# Altium PCB DSP大板子.PcbDoc (part 7 of 9)
Units mil, origin at the board's own origin, x right, y up, seen from the top; angles counter-clockwise.
Board outline 7874.02 x 9055.12 mil, 4 copper layers (Top Layer, GND02, PWR03, Bottom Layer), stack 23.756 mil thick; 656 components, 360 nets, 1967 pads, 2623 vias.
Unrouted connection lines stored in the file: 70.
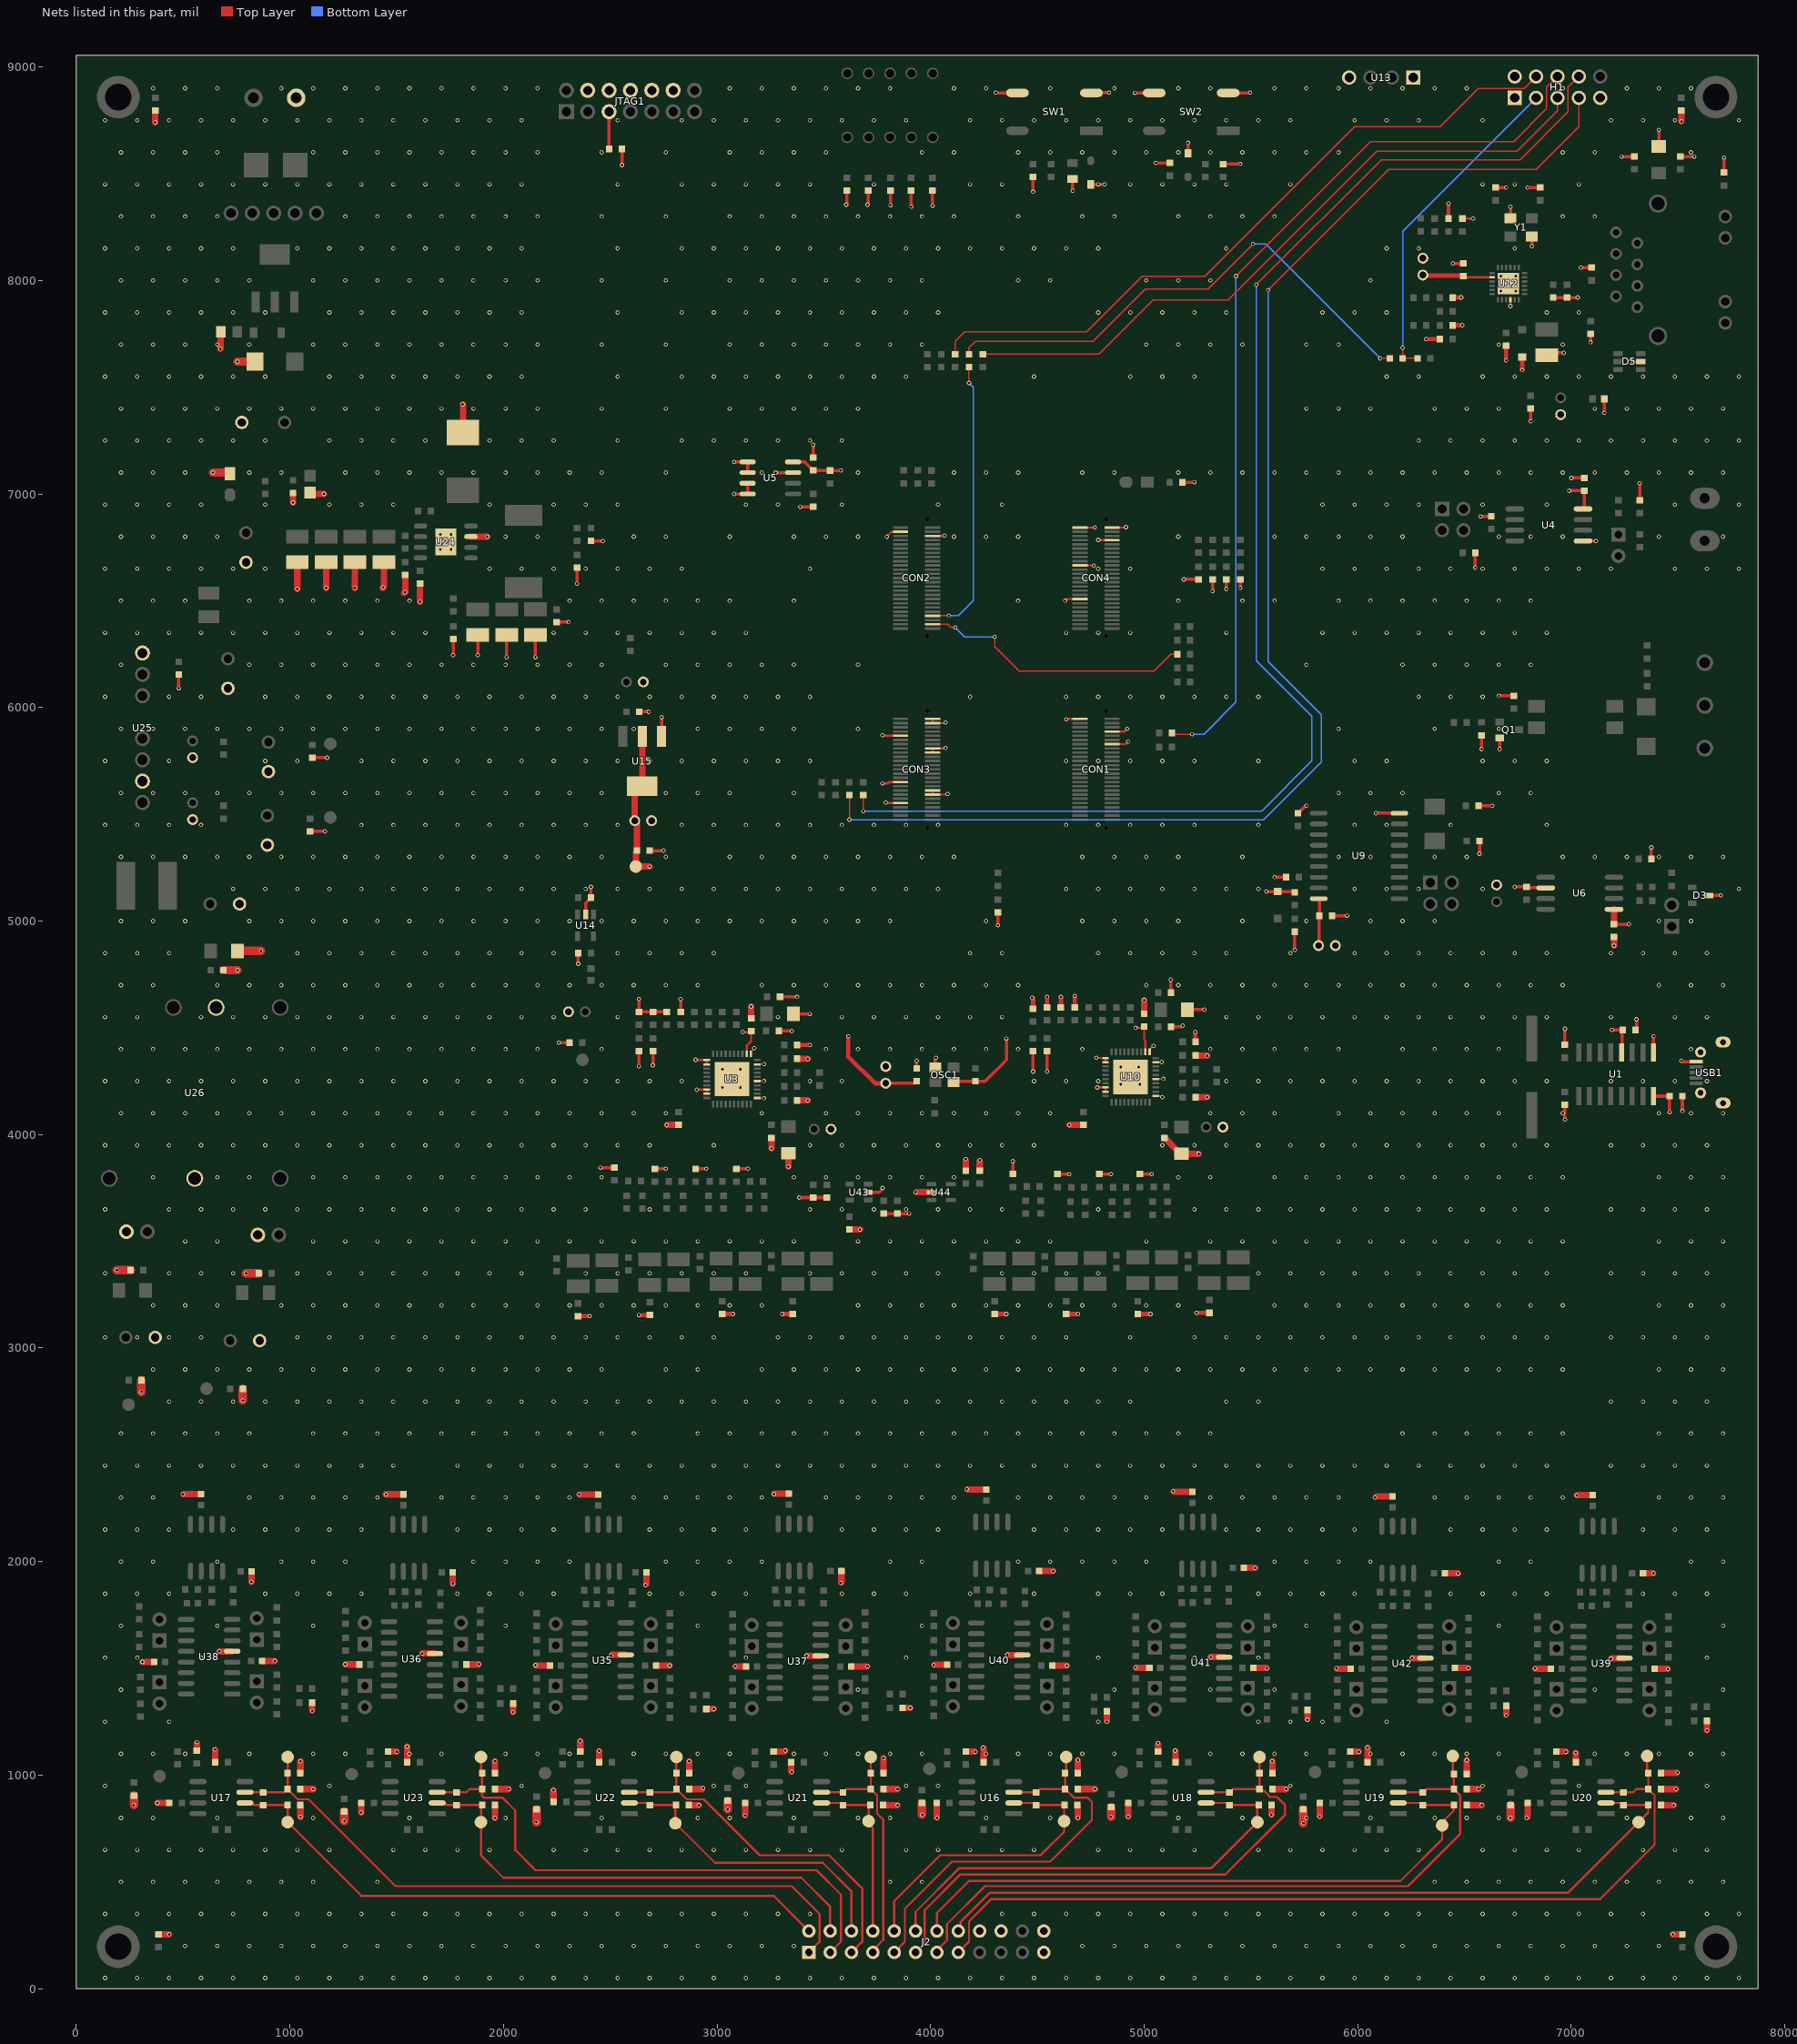
[diagram p6: the nets of this part, all layers, seen from the top]

## Via types
v1: diameter 20, hole 12, Top Layer to Bottom Layer, tented both sides, 2623 vias

## Nets (pads, with @x,y where several pads share a name; then routed paths per layer and width w, separated by ;. In a path a pad name is that pad's centre, name@x,y a point inside that pad or via, vN(x,y) a via of type N, cw(c..) or ccw(c..) an arc to the next point about the centre after c; other vN are vias at no path point) (continued)
GND: C1.1 C2.2 C4.2 C5.2 C8.1 C9.1 C10.2 C11.1 C13.1 C14.1 C17.1 C18.2 C19.2 C21.1 C22.2 C23.1 C24.2 C27.2 C28.2 C29.2 C30.1 C32.1 C35.1 C36.2 C39.2 C40.2 C42.2 C43.2 C46.2 C50.2 C51.2 C52.1 C54.2 C55.1 C56.2 C57.1 C58.1 C61.1 C62.2 C63.2 C65.1 C68.2 C69.1 C72.2 C73.2 C74.2 C75.2 C76.1 C77.1 C78.1 C79.1 C80.2 C81.1 C82.2 C83.2 C84.2 C85.2 C87.2 C88.2 C89.2 C90.2 C91.2 C92.2 C93.2 C94.2 C95.2 C96.2 C97.2 C98.2 C99.2 C100.2 C101.2 C102.2 C103.2 C104.2 C105.2 C106.2 C107.2 C108.1 C109.1 C110.1 C111.1 C112.1 C113.1 C114.2 C115.2 C116.2 C117.1 C118.2 C119.2 C120.2 C121.1 C122.1 C123.2 C124.1 C125.1 C126.1 C127.1 C128.1 C129.1 C130.1 C131.1 C132.1 C133.1 C134.1 C135.1 C136.1 C137.1 C138.2 C139.2 C140.2 C141.1 C142.2 C143.2 C144.1 C145.2 C154.1 C155.1 C156.2 C157.2 C158.1 C159.1 C160.1 C161.1 C162.1 C163.1 C164.1 C165.1 C166.1 C167.1 C168.1 C169.1 C170.1 C171.1 C172.1 C173.1 C174.1 C175.2 C178.2 C179.1 C180.2 C181.1 C182.1 C183.1 C184.1 C185.1 C186.1 C187.1 C188.1 C189.1 C190.1 C191.1 C192.1 C193.1 C194.1 C195.1 C196.1 C197.1 C198.1 C199.1 C200.1 CON1.37 CON1.43 CON1.50 CON2.45 CON2.48 CON3.10 CON3.13 CON3.15 CON3.20 CON3.33 CON3.35 CON3.47 CON3.49 CON4.16 CON4.32 CON4.43 CON4.49 CON4.50 D3.3 D5.2 D6.2 D8.2 H1.2 H1.9 J2.18 J2.20 J2.23 J2.24 JTAG1.4 JTAG1.6 JTAG1.8 JTAG1.10 JTAG1.12 LED2.1 OSC1.2 P2.1 Q1.2 R6.1 R12.1 R23.1 R32.1 R35.1 R36.2 R37.1 R44.2 R46.1 R51.1 R53.1 R55.2 R56.1 R65.1 R70.2 R71.1 R73.1 R85.2 R86.1 R88.2 R89.1 R96.2 R102.1 R103.1 R120.1 R123.1 R125.1 R132.1 R133.1 R134.1 R135.1 R139.1 R140.1 R141.1 R145.1 R146.1 R148.2 R150.1 R152.2 R153.2 R155.2 R157.2 R158.2 R160.2 R163.2 R229.1 R232.1 R235.1 R236.1 R237.1 R238.1 R239.1 R242.1 R246.1 R248.1 R250.1 R251.1 R253.1 R254.1 R255.1 R257.1 R274.1 R275.1 R276.1 R277.1 R278.1 R279.1 R280.1 R281.1 R300.2 R301.2 R302.2 R303.2 SW1.2 SW1.3 SW2.2 SW2.3 U1.1 U3.1 U3.5 U3.9 U3.11 U3.21 U3.22 U3.28 U3.29 U3.41 U4.5 U5.1 U5.2 U5.3 U5.4 U5.7 U6.2 U9.9 U10.1 U10.5 U10.9 U10.11 U10.21 U10.22 U10.28 U10.29 U10.41 U12.22 U12.25 U13.4 U14.2 U15.1 U24.7 U24.9 U25.1 U25.7 U26.2 U26.5 U35.5 U36.5 U37.5 U38.5 U39.5 U40.5 U41.5 U42.5 U43.2 U44.2 USB1.5 USB1.6 USB1.7 USB1.8 USB1.9 Y1.2 Y1.4 Z1.1 Z2.1 | length 17545.7
  Top Layer w6: U3.11@3158.6,4378.2 3158.6,4388.45 v1(3175,4404.85) v1@3175,4405 ; U3.1@3188.1,4171.5 3188.85,4170.75 3219.25,4170.75 v1(3220,4170) ; U3.5@3188.1,4250.2 3188.45,4250.55 3219.65,4250.55 v1(3220,4250.9) ; U3.9@3188.1,4328.9 3188.65,4329.45 3219.45,4329.45 v1(3220,4330) ; U10.11@5025.55,4388.2 5025.55,4398.45 5042.1,4415 v1(5045,4415) ; U10.1@5055.05,4181.5 5078.5,4181.5 v1(5085,4175) ; U10.5@5055.05,4260.2 5055.7,4260.85 5089.35,4260.85 v1(5090,4261.5) ; U10.9@5055.05,4338.9 5055.33,4339.18 5081.73,4339.18 v1(5082,4339.45)
  Top Layer w10: v1(500,2315) v1@500.68,2315.68 ; v1@650,1120 v1(650.08,1119.92) ; v1(820,1905) v1@820.6,1905.6 ; v1@1049.92,805.08 v1(1050,805) ; v1@1049.92,1064.92 v1(1050,1065) ; v1(1260,1520) v1@1261.37,1518.63 ; v1@1450,2315 v1(1450.27,2315.27) ; v1(1549.38,1134.38) v1@1550,1135 ; U36.5@1678.69,1570 U36.5@1679.63,1569.07 ; v1@1762.53,1897.47 v1(1763.76,1896.24) v1@1765,1895 ; v1@1883.63,1518.63 v1(1885,1520) ; v1@1959.92,800.08 v1(1960,800) ; v1(1959.91,1064.91) v1@1960,1065 ; v1(2150,1515) v1@2151.47,1513.53 ; v1(2234.34,929.34) v1@2235,930 ; v1(2355,2315) v1@2355.93,2314.07 ; v1(2448.67,1113.67) v1@2450,1115 ; v1(2505,1560) v1@2508.53,1563.53 ; v1(2665,1890) v1@2669.04,1894.04 ; v1(2778.53,1513.53) v1@2780,1515 ; C94.2@2868.47,860 C94.2@2873.47,855 ; v1@2869.9,1064.9 v1(2870,1065) ; v1(2900,4350) 2900.9,4349.1 2951.4,4349.1 U3.21@2951.9,4348.6 U3.22@2951.9,4328.9 ; v1(2905,4210) 2905.8,4210.8 U3.28@2951.9,4210.8 U3.29@2951.9,4191.1 ; v1@2930,935 v1(2935,940) ; v1(3085,1510) v1@3086.83,1508.17 ; v1@3265,2315 v1@3267.61,2317.61 ; v1@3347.97,1017.03 v1(3350,1015) ; v1(3420,1560) v1@3421.83,1558.17 ; v1(3580,1900) v1@3582.59,1902.59 ; v1@3703.17,1508.17 v1(3705,1510) ; v1(3775,5645) 3800.45,5645 3806.65,5651.2 CON3.20@3859.84,5651.2 ; v1@3779.89,1079.89 v1(3780,1080) ; v1(3790,5555) 3792.2,5552.8 CON3.10@3859.84,5552.8 ; v1(3795,6800) 3816.96,6821.96 3858.94,6821.96 CON2.48@3859.84,6822.86 ; CON3.15@4009.44,5611.9 CON3.13@4009.44,5592.2 4077.2,5592.2 v1(4080,5595) ; CON3.33@4009.44,5789 CON3.35@4009.44,5808.7 4068.7,5808.7 v1(4070,5810) ; CON3.49@4009.44,5946.5 CON3.47@4009.44,5926.8 4066.8,5926.8 v1(4070,5930) ; CON2.45@4009.44,6803.26 4063.26,6803.26 v1(4065,6805) ; v1(4015,1515) v1@4017.85,1517.85 ; v1@4028.61,801.39 v1(4030,800) ; v1(4170,2340) v1@4173.31,2336.69 ; v1@4245,1130 v1@4247.27,1127.73 ; v1(4360,1565) v1@4362.15,1562.85 ; v1@4573.91,1956.09 v1@4575,1955 ; v1(4630,6500) 4637.96,6507.96 CON4.16@4700,6507.96 ; v1(4635,5945) 4636.5,5946.5 CON1.50@4700,5946.5 ; v1(4637.85,1512.85) v1@4640,1515 ; C87.2@4687.02,860 C87.2@4688.51,858.51 ; v1@4688.51,801.49 v1(4690,800) ; R148.2@4689.88,1010 R148.2@4690,1010.12 ; CON4.32@4700,6665.46 4764.54,6665.46 v1(4765,6665) ; CON4.50@4700,6842.56 4767.56,6842.56 v1@4770,6845 ; v1(4775,4360) 4776.4,4358.6 U10.21@4818.85,4358.6 U10.22@4818.85,4338.9 ; v1@4780,4220 v1(4780.8,4220.8) U10.28@4818.85,4220.8 U10.29@4818.85,4201.1 ; v1(4785,6785) 4786.44,6783.56 CON4.43@4849.6,6783.56 ; CON1.37@4849.6,5828.4 4913.4,5828.4 v1(4925,5840) ; CON1.43@4849.6,5887.5 4907.5,5887.5 v1(4920,5900) ; CON4.49@4849.6,6842.56 4912.56,6842.56 v1(4915,6845) ; v1@4925,805 v1@4925.74,805.74 ; v1(4960,1505) v1@4962.15,1502.85 ; v1(5135,2330) v1@5138.31,2326.69 ; v1(5145,1115) v1@5146.56,1113.44 ; v1@5310,1555 v1(5312.15,1552.85) ; v1@5518.91,1971.09 v1(5520,1970) ; v1@5572.15,1502.85 v1(5575,1500) ; v1(5595,815) v1@5595.65,815.65 ; C89.2@5595.65,859.35 C89.2@5596.29,860 ; R153.2@5599.87,1010 R153.2@5600,1010.13 ; v1@5820,805 v1@5822.87,807.87 ; v1(5900,1500) v1@5902.3,1497.7 ; v1@6045,1130 v1(6045.86,1129.14) ; v1(6080,2300) v1@6086.22,2306.22 ; v1(6255,1550) v1@6257.3,1547.7 ; v1@6469.38,1945.62 v1(6470,1945) ; R88.2@6490,8289.84 6490.08,8289.92 6539.92,8289.92 v1(6540,8290) ; v1@6517.3,1502.7 v1@6520,1500 ; U12.22@6714.84,7909.9 6714.84,7880.16 v1(6715,7880) ; v1(6790,800) v1@6794.99,804.99 ; v1(6830,1500) v1@6832.38,1497.62 ; v1(7025,2310) v1@7026.22,2311.22 ; v1(7185,1545) v1@7187.62,1547.62 ; v1@7384.38,1945.62 v1@7385,1945 ; v1(7452.62,1497.62) v1@7455,1500 ; v1@7495,1010 v1@7500,1015
  Top Layer w15: v1(480,6090) C139.2@480,6155.08 ; C145.2@1095,5420 v1(1165,5420) ; C143.2@1105,5765.08 1174.92,5765.08 v1(1175,5765) ; v1(1765,6245) R150.1@1765,6320.08 ; v1(1880,6245) C114.2@1880,6340 ; v1(2015,6235) C115.2@2015,6340.2 ; v1(2150,6235) C116.2@2150,6340.5 ; C110.1@2250,6400.16 2304.84,6400.16 v1(2305,6400) ; v1(2260,4430) C81.1@2310.08,4430 ; v1(2345,6580) C117.1@2345,6655 ; v1(2350,4800) 2350.08,4800.08 C79.1@2350.08,4850 ; U14.2@2385,5031.2 2385,5084.29 2409.92,5109.21 C78.1@2409.92,5110 v1(2409.92,5159.92) v1@2410,5160 ; C108.1@2410,6780 v1(2465,6780) ; v1(2455,3845) 2519.84,3845 R6.1@2520,3844.84 ; C5.2@2554.92,8615 v1(2554.92,8540.08) v1@2555,8540 ; v1(2635,4320) R36.2@2635,4390 ; C85.2@2635,5980 v1(2680,5980) ; C83.2@2684.84,5330 v1(2750,5330) ; v1(2700,4325) R37.1@2700,4390.08 ; R23.1@2710,3839.84 2759.84,3839.84 v1(2760,3840) ; v1@2740,5955 v1(2740.55,5954.45) U15.1@2740.55,5865 ; R35.1@2900,3839.84 2949.84,3839.84 v1(2950,3840) ; v1(3080,7000) U5.4@3143.5,7000 U5.3@3143.5,7050 ; v1(3080,7150) U5.1@3143.5,7150 U5.2@3143.5,7100 ; R46.1@3090,3839.84 3144.84,3839.84 v1(3145,3840) ; v1(3275,7100) U5.7@3356.5,7100 ; C30.1@3289.92,4485 v1(3350,4485) ; R53.1@3295,4645 v1(3375,4645) ; C32.1@3357.7,4565 v1(3435,4565) ; v1(3385,3705) C199.1@3450,3705 ; C18.2@3450,7169.84 v1(3450,7230) ; C199.1@3455.04,3705.04 3514.96,3705.04 C200.1@3515,3705.08 ; U43.2@3708.31,3730 3760,3730 v1@3775,3745 ; C198.1@3780,3630.08 C197.1@3844.92,3630.08 ; C197.1@3845,3630.08 3845.08,3630 v1(3900,3630) ; C11.1@3935,4309.92 v1(3935,4345) ; OSC1.2@4021.7,4314.5 4021.7,4356.7 v1(4025,4360) ; 4315,8880 4316.83,8878.17 SW1.3@4406.77,8878.17 ; R56.1@4385,3814.84 v1(4385,3875) ; v1(4480,4295) R70.2@4480,4390 ; v1(4545,4295) R71.1@4545,4390.08 ; R65.1@4595,3814.84 v1(4649.84,3814.84) v1@4650,3815 ; v1(4665,8420) C1.1@4665,8475.2 ; Z1.1@4750,8449.88 v1(4814.94,8449.94) v1@4815,8450 ; SW1.2@4753.23,8878.17 4755.06,8880 v1(4835,8880) ; R73.1@4790,3814.84 v1(4844.84,3814.84) v1@4845,3815 ; v1@4955,8880 v1(4956.83,8878.17) SW2.3@5047.06,8878.17 ; R86.1@4980,3814.84 v1(5034.84,3814.84) v1@5035,3815 ; v1(5055,8550) 5055.08,8549.92 5119.92,8549.92 C9.1@5120,8549.84 ; C61.1@5124.92,4505 5175,4505 v1(5180,4510) ; R89.1@5124.92,4665 5124.92,4724.92 v1(5125,4725) ; R32.1@5179.84,7055 v1(5235,7055) ; v1(5185,6600) 5185.08,6600.08 R125.1@5255,6600.08 ; C65.1@5202.7,4585 v1(5282.3,4585) ; Z2.1@5205,8595.12 v1(5205,8645) ; SW2.2@5393.51,8878.17 5493.17,8878.17 v1(5495,8880) ; v1(5705,4865) C17.1@5705,4950 ; C43.2@5880,5025 v1(5950,5025) ; v1(6085,5505) U9.9@6195,5505 ; v1(6445,8080) 6445.08,8079.92 C73.2@6495,8079.92 ; C36.2@6564.84,5540 v1(6630,5540) ; C40.2@6569.92,5375 6569.92,5325.08 6570,5325 ; v1(6575,6895) 6575.08,6894.92 R51.1@6625,6894.92 ; v1(6580,5805) R12.1@6580,5870 ; C76.1@6645,8434.84 6645.16,8435 v1(6695,8435) ; Q1.2@6664.73,5857.6 6664.73,5805.27 v1(6665,5805) ; Y1.2@6715,8291.61 v1(6715,8345) ; v1@6735,5160 v1(6735.16,5159.84) C27.2@6790,5159.84 6793.12,5156.72 6878.28,5156.72 U6.2@6880,5155 ; v1@6795,8435 v1(6795.16,8434.84) C77.1@6854.64,8434.84 ; v1(6810,7340) C56.2@6810,7400.08 ; v1(6815,8160) Y1.4@6815,8205 ; C55.1@6885,7660.5 6964.5,7660.5 v1(6965,7660) ; C57.1@6915,7920 C57.1@6915,7920 6979.96,7920.04 C58.1@6980,7920.08 v1(7029.92,7920.08) v1@7030,7920 ; v1(6970,4070) C14.1@6970,4140.08 ; C13.1@6970,4419.84 v1(6970,4495) ; v1@7000,7075 v1(7000.08,7074.92) C35.1@7060,7074.92 ; v1(7045,8060) 7045.08,8059.92 C74.2@7095,8059.92 ; U4.5@7055,6780 v1(7115,6780) ; v1(7090,7710) C75.2@7090,7750.16 ; v1(7235,8580) 7235.08,8579.92 R96.2@7295,8579.92 ; v1(7275,7620) D5.2@7325,7620 ; C4.2@7299.92,4490 7305,4495.08 v1(7305,4540) ; R55.2@7320,6969.92 v1(7320,7050) ; R44.2@7374.92,5290 7374.92,5344.92 v1(7375,5345) ; U1.1@7385,4384.72 v1(7385,4460) ; C69.1@7410,8627.7 v1(7410,8705) ; R85.2@7510,8579.84 7574.84,8579.84 v1(7575,8580) ; v1(7515,4345) 7518.35,4341.65 USB1.5@7584.42,4341.65 ; C2.2@7519.84,4180 v1(7519.84,4110.16) v1@7520,4110 ; D3.3@7644.37,5120 v1(7700,5120)
  Top Layer w20: R120.1@2350,3150 v1(2405,3150) ; v1(2635,3155) R123.1@2685,3155 ; R133.1@3024.84,3160.08 3074.92,3160.08 v1(3075,3160) ; v1(3305,3160) 3354.92,3160 R134.1@3355,3160.08 ; R135.1@4300,3160 v1(4355,3160) ; R139.1@4635.08,3160 v1(4690,3160) ; R140.1@4970,3160 v1(5030,3160) ; v1(5245,3165) 5304.92,3165 R141.1@5305,3165.08 ; R102.1@6444.84,7790 v1(6490,7790) ; R103.1@6444.92,7920 v1(6485,7920)
  Top Layer w30: v1(310,1530) C183.1@364.4,1530 ; v1(370,8740) R303.2@370,8795.08 ; v1(380,870) C96.2@435.08,870 ; R300.2@385,254.92 434.92,254.92 v1(435,255) ; v1@500.68,2315.68 C173.1@585,2315.68 ; R235.1@565,1114.84 v1@565,1150 ; C126.1@650.08,1060 v1(650.08,1119.92) ; v1(670,1580) U38.5@730.4,1580 ; v1(675,7680) 676.96,7681.96 R274.1@676.96,7760 ; v1@820.6,1905.6 C174.1@820.6,1955.08 ; C184.1@870,1535 v1(930,1535) ; v1(1015,6960) C180.2@1015,7005.08 ; v1(1035,6555) C103.2@1035,6680.2 ; v1@1049.92,805.08 C88.2@1049.92,860 ; C125.1@1049.92,935 v1(1110,935) ; R152.2@1049.92,1010 v1@1049.92,1064.92 ; C179.1@1095,7005.63 1100.63,7000 v1(1160,7000) ; v1@1105,1305 R255.1@1105,1340 ; v1(1170,6560) C104.2@1170,6680.2 ; v1@1261.37,1518.63 C185.1@1325.03,1518.63 ; v1(1305,6560) C105.2@1305,6680.2 ; v1(1335,825) 1335.08,825.08 C107.2@1335.08,870 ; v1@1435,6560 v1(1437.5,6562.5) 1440,6565 C106.2@1440,6680.2 ; v1(1450.27,2315.27) C166.1@1531.93,2315.27 ; R239.1@1460,1109.92 1460.04,1109.96 v1(1500,1110) v1(1500,1110) ; v1@1535,6535 v1(1540,6540) R146.1@1540,6620 ; C137.1@1549.38,1060 v1(1549.38,1134.38) ; v1(1610,6495) R132.1@1610,6580.08 ; v1(1620,1570) U36.5@1678.69,1570 ; v1@1762.53,1897.47 C167.1@1762.53,1949.07 ; v1(1810,7420) 1810.58,7419.42 D6.2@1810.58,7288.2 ; C186.1@1826.23,1518.63 v1@1883.63,1518.63 ; U24.7@1848.11,6800 v1(1925,6800) ; v1@1959.92,800.08 C95.2@1959.92,860 ; C136.1@1959.91,935 v1(2025,935) ; R163.2@1959.91,1010 v1(1959.91,1064.91) ; R251.1@2044.92,1335 2044.96,1334.96 v1(2045,1295.06) v1(2045,1295.06) ; v1@2151.47,1513.53 C181.1@2218.75,1513.53 ; C100.2@2234.34,875 v1(2234.34,929.34) ; v1@2355.93,2314.07 C168.1@2443.44,2314.07 ; R237.1@2360,1109.92 v1(2360,1160) ; C135.1@2448.67,1060 v1(2448.67,1113.67) ; v1@2508.53,1563.53 U35.5@2572.65,1563.53 ; v1@2669.04,1894.04 C169.1@2669.04,1949.07 ; C182.1@2714.95,1513.53 v1(2778.53,1513.53) ; v1(2765,4045) 2765.08,4045.08 C8.1@2820,4045.08 ; C134.1@2869.9,935 v1@2930,935 ; R158.2@2869.9,1010 v1@2869.9,1064.9 ; C94.2@2878.47,860 v1(2915,860) ; R253.1@2949.92,1310 v1(2985,1310) ; v1@3086.83,1508.17 C187.1@3136.7,1508.17 ; v1(3131.47,811.59) C101.2@3131.47,870 ; C19.2@3160,4544.92 v1(3160,4600) ; v1(3255,3935) C21.1@3255,3985 ; R238.1@3265,1109.84 3265.04,1109.88 3314.88,1109.88 v1(3320,1115) ; v1@3267.61,2317.61 C170.1@3336.39,2317.61 ; v1(3335,3850) C23.1@3335,3912.3 ; v1@3347.97,1017.03 C133.1@3347.97,1060 ; C39.2@3374.92,4355 v1(3425,4355) ; C28.2@3375,4160 v1(3425,4160) ; v1@3421.83,1558.17 U37.5@3485.6,1558.17 ; v1@3582.59,1902.59 C171.1@3582.59,1956.41 ; C175.2@3620,3555 v1(3670,3555) ; C188.1@3628.5,1508.17 v1@3703.17,1508.17 ; C91.2@3777.74,860 v1(3845,860) ; C132.1@3779.89,935 v1(3845,935) ; R160.2@3779.89,1010 v1@3779.89,1079.89 ; R254.1@3869.92,1315 v1(3905,1315) ; v1@3935,3730 U44.2@4004.58,3730 ; v1@4017.85,1517.85 C189.1@4078.56,1517.85 ; v1@4028.61,801.39 C92.2@4028.61,870 ; R145.1@4165,1109.84 4165.04,1109.88 4204.88,1109.88 v1@4205,1110 ; C111.1@4165,3829.92 v1@4165,3880 ; v1@4173.31,2336.69 C160.1@4261.62,2336.69 ; C109.1@4230,3829.92 v1@4230,3875 ; C121.1@4247.27,1060 v1@4247.27,1127.73 ; v1@4362.15,1562.85 U40.5@4429.58,1562.85 ; C161.1@4507.22,1956.09 v1@4573.91,1956.09 ; C190.1@4570.36,1512.85 v1(4637.85,1512.85) ; v1(4650,4045) 4650.08,4045.08 C46.2@4715,4045.08 ; v1@4688.51,801.49 C87.2@4688.51,858.51 ; C122.1@4689.88,935 v1(4770,935) ; R148.2@4690,1010.12 v1(4690,1070) ; R246.1@4824.92,1300 4824.96,1299.96 4824.96,1255.04 v1@4825,1255 ; v1@4925.74,805.74 C97.2@4925.74,870 ; v1@4962.15,1502.85 C195.1@5024.47,1502.85 ; C50.2@5000,4564.84 v1(5000,4630) ; R229.1@5065,1109.92 v1@5065,1145 ; C51.2@5095,3985 5095.71,3985 5156,3924.71 5156,3924.25 5165.25,3915 C52.1@5175,3915 ; v1@5138.31,2326.69 C158.1@5226.48,2326.69 ; C124.1@5146.56,1060 v1@5146.56,1113.44 ; C52.1@5175,3910 v1(5255,3910) ; C62.2@5239.92,4175 v1(5295,4175) ; C68.2@5239.92,4370 v1(5295,4370) ; v1(5312.15,1552.85) U41.5@5374.25,1552.85 ; C159.1@5467.08,1971.09 v1@5518.91,1971.09 ; C196.1@5510.67,1502.85 v1@5572.15,1502.85 ; v1@5595.65,815.65 C89.2@5595.65,859.35 ; C127.1@5599.86,935 v1(5665,935) ; R153.2@5600,1010.13 v1(5600,1065) ; R242.1@5764.92,1305 5764.96,1304.96 5764.96,1265.04 v1@5765,1265 ; v1@5822.87,807.87 C98.2@5822.87,870 ; v1@5902.3,1497.7 C193.1@5967.33,1497.7 ; R232.1@5965,1109.84 5965.04,1109.88 6004.88,1109.88 v1(6005,1110) ; C129.1@6045.86,1060 v1(6045.86,1129.14) ; v1@6086.22,2306.22 C162.1@6162.82,2306.22 ; v1@6257.3,1547.7 U42.5@6317.01,1547.7 ; C163.1@6408.42,1945.62 v1@6469.38,1945.62 ; C194.1@6454.13,1502.7 v1@6517.3,1502.7 ; C128.1@6509.85,935 v1(6565,935) ; C90.2@6509.92,860 v1(6580,860) ; R155.2@6510,1005 v1(6510,1070) ; R248.1@6694.92,1325 6694.96,1324.96 6694.96,1285.04 v1@6695,1285 ; v1@6794.99,804.99 C99.2@6794.99,870 ; v1@6832.38,1497.62 C191.1@6905,1497.62 ; R236.1@6930,1109.84 6930.04,1109.88 6974.88,1109.88 v1(6975,1110) ; v1(7020,1105) 7020.69,1104.31 C131.1@7020.69,1060 ; v1@7026.22,2311.22 C164.1@7100.61,2311.22 ; v1@7187.62,1547.62 U39.5@7248.38,1547.62 ; v1(7200,4885) C24.2@7200,4925.08 ; C165.1@7335.61,1945.62 v1@7384.38,1945.62 ; C192.1@7390.6,1497.62 v1(7452.62,1497.62) ; C130.1@7419.84,935 v1(7490,935) ; R157.2@7419.84,1010 v1@7495,1010 ; C93.2@7420,860 v1(7480,860) ; v1(7475,255) 7475.08,254.92 R301.2@7520,254.92 ; v1(7515,8745) R302.2@7515,8795.08 ; R250.1@7634.92,1255 7634.96,1254.96 v1(7635,1210) v1(7635,1210)
  Top Layer w40: v1(190,3365) C155.1@255,3365 ; v1(270,860) R281.1@270,905.08 ; C154.1@304.92,2850 v1(304.92,2795.08) v1@305,2795 ; v1(640,7100) 715,7100 LED2.1@720,7095 ; C157.2@689.92,4770 v1(755,4770) ; C172.1@755,4860 v1(865,4860) ; v1(755,7620) D8.2@837.06,7620 ; C119.2@779.92,2810 779.92,2755.08 v1(780,2755) ; v1(795,3350) C118.2@855.08,3350 ; v1(1255,785) R278.1@1255,830.16 ; v1(2155,780) R279.1@2155,840.08 ; v1(3050,840) R280.1@3050,880 ; v1(3960,815) R275.1@3960,870 ; v1(4845,805) R257.1@4845,850 ; v1(5745,775) R276.1@5745,840.08 ; v1(6715,800) R277.1@6715,860.08
  other v1: 135,50 285,50 435,50 585,50 735,50 885,50 1035,50 1185,50 1335,50 1485,50 1635,50 1785,50 1935,50 2085,50 2235,50 2385,50 2535,50 2685,50 2835,50 2985,50 3135,50 3285,50 3435,50 3585,50 3735,50 3885,50 4035,50 4185,50 4335,50 4485,50 4635,50 4785,50 4935,50 5085,50 5235,50 5385,50 5535,50 5685,50 5835,50 5985,50 6135,50 6285,50 6435,50 6585,50 6735,50 6885,50 7035,50 7185,50 7335,50 7485,50 7635,50 7785,50 510,200 660,200 810,200 960,200 1110,200 1260,200 1410,200 1560,200 1710,200 1860,200 2010,200 2160,200 2310,200 2460,200 2610,200 2760,200 2910,200 3060,200 3210,200 3360,200 4710,200 4860,200 5010,200 5160,200 5310,200 5460,200 5610,200 5760,200 5910,200 6060,200 6210,200 6360,200 6510,200 6660,200 6810,200 6960,200 7110,200 7260,200 7410,200 135,350 285,350 435,350 585,350 735,350 885,350 1035,350 1185,350 1335,350 1485,350 1635,350 1785,350 1935,350 2085,350 2235,350 2385,350 2535,350 2685,350 2835,350 2985,350 3135,350 3285,350 3435,350 4335,350 4485,350 4635,350 4785,350 4935,350 5085,350 5235,350 5385,350 5535,350 5685,350 5835,350 5985,350 6135,350 6285,350 6435,350 6585,350 6735,350 6885,350 7035,350 7185,350 7335,350 7635,350 7785,350 210,500 360,500 510,500 660,500 810,500 960,500 1110,500 1410,500 3810,500 3960,500 6360,500 6510,500 6660,500 6810,500 6960,500 7110,500 7260,500 7410,500 7560,500 7710,500 135,650 285,650 435,650 585,650 735,650 885,650 1035,650 1185,650 1485,650 1635,650 1785,650 1935,650 2235,650 2385,650 2535,650 2685,650 2835,650 2985,650 3135,650 3285,650 3435,650 3585,650 3885,650 4035,650 4185,650 4335,650 4485,650 4785,650 4935,650 5085,650 5235,650 5535,650 5685,650 5835,650 5985,650 6135,650 6285,650 6585,650 6735,650 6885,650 7035,650 7335,650 7485,650 7635,650 210,800 360,800 660,800 1110,800 1560,800 2010,800 2460,800 2910,800 3060,800 3360,800 3660,800 3810,800 4260,800 4560,800 5160,800 5460,800 5760,800 6060,800 6360,800 6510,800 6660,800 7260,800 7560,800 7710,800 4925.37,805.37 5821.43,806.43 135,950 1185,950 2085,950 2985,950 3135,950 3885,950 4035,950 5685,950 6585,950 7035,950 7635,950 7497.5,1012.5 210,1100 360,1100 510,1100 810,1100 1110,1100 1260,1100 1560,1100 1710,1100 2010,1100 2160,1100 2310,1100 2610,1100 2760,1100 2910,1100 3060,1100 3360,1100 3510,1100 3660,1100 3810,1100 3960,1100 4260,1100 4410,1100 4560,1100 4710,1100 4860,1100 5310,1100 5460,1100 5610,1100 5760,1100 6060,1100 6210,1100 6360,1100 6510,1100 6660,1100 7110,1100 7260,1100 7410,1100 7560,1100 7710,1100 4210,1110 4246.13,1128.87 5065,1150 565,1155 135,1250 435,1250 4785,1250 4825,1250 5535,1250 5685,1250 5835,1250 6135,1250 5765,1260 6695,1280 1105,1300 210,1400 3660,1400 4860,1400 5310,1400 5610,1400 7110,1400 7710,1400 6518.65,1501.35 135,1550 285,1550 585,1550 3135,1550 3885,1550 4785,1550 5235,1550 5535,1550 7635,1550 210,1700 660,1700 1110,1700 2010,1700 2910,1700 3960,1700 5610,1700 5760,1700 6660,1700 7710,1700 135,1850 285,1850 435,1850 885,1850 1035,1850 1185,1850 1335,1850 1785,1850 1935,1850 2085,1850 2235,1850 2685,1850 2835,1850 2985,1850 3135,1850 3585,1850 3735,1850 3885,1850 4185,1850 4485,1850 4785,1850 4935,1850 5085,1850 5535,1850 5685,1850 5835,1850 5985,1850 6435,1850 6585,1850 6735,1850 6885,1850 7335,1850 7485,1850 7635,1850 7384.69,1945.31 4574.46,1955.54 210,2000 360,2000 660,2000 960,2000 1110,2000 1260,2000 1860,2000 2010,2000 2160,2000 2310,2000 2760,2000 2910,2000 3060,2000 3210,2000 3810,2000 3960,2000 4410,2000 4560,2000 4710,2000 4860,2000 5010,2000 5610,2000 5760,2000 5910,2000 6060,2000 6660,2000 6810,2000 7560,2000 7710,2000 135,2150 285,2150 435,2150 735,2150 885,2150 1035,2150 1185,2150 1335,2150 1785,2150 1935,2150 2085,2150 2235,2150 2685,2150 2835,2150 2985,2150 3135,2150 3585,2150 3735,2150 3885,2150 4035,2150 4485,2150 4635,2150 4785,2150 4935,2150 5085,2150 5385,2150 5535,2150 5685,2150 5835,2150 5985,2150 6435,2150 6585,2150 6735,2150 6885,2150 7335,2150 7485,2150 7635,2150 210,2300 360,2300 810,2300 960,2300 1110,2300 1260,2300 1410,2300 1710,2300 1860,2300 2010,2300 2160,2300 2310,2300 2610,2300 2760,2300 2910,2300 3060,2300 3210,2300 3510,2300 3660,2300 3810,2300 3960,2300 4110,2300 4410,2300 4560,2300 4710,2300 4860,2300 5010,2300 5310,2300 5460,2300 5610,2300 5760,2300 5910,2300 6360,2300 6510,2300 6660,2300 6810,2300 6960,2300 7410,2300 7560,2300 7710,2300 3266.3,2316.3 135,2450 285,2450 435,2450 585,2450 735,2450 885,2450 1035,2450 1185,2450 1335,2450 1485,2450 1785,2450 1935,2450 2085,2450 2235,2450 2385,2450 2535,2450 2685,2450 2835,2450 2985,2450 3135,2450 3285,2450 3435,2450 3585,2450 3735,2450 3885,2450 4035,2450 4185,2450 4335,2450 4485,2450 4635,2450 4785,2450 4935,2450 5085,2450 5235,2450 5385,2450 5535,2450 5685,2450 5835,2450 5985,2450 6135,2450 6285,2450 6435,2450 6585,2450 6735,2450 6885,2450 7185,2450 7335,2450 7485,2450 7635,2450 210,2600 360,2600 510,2600 660,2600 810,2600 1110,2600 1260,2600 1410,2600 1560,2600 1710,2600 1860,2600 2010,2600 2160,2600 2310,2600 2460,2600 2610,2600 2910,2600 3060,2600 3210,2600 3360,2600 3510,2600 3660,2600 3810,2600 3960,2600 4110,2600 4260,2600 4410,2600 4560,2600 4710,2600 4860,2600 5010,2600 5160,2600 5310,2600 6210,2600 6360,2600 6510,2600 6660,2600 6810,2600 6960,2600 7410,2600 7560,2600 7710,2600 435,2750 585,2750 735,2750 885,2750 1035,2750 1185,2750 1335,2750 1485,2750 1635,2750 1785,2750 1935,2750 2085,2750 2235,2750 2385,2750 2535,2750 2685,2750 2835,2750 2985,2750 3135,2750 3285,2750 3435,2750 3585,2750 3735,2750 3885,2750 4035,2750 4185,2750 4335,2750 4485,2750 4635,2750 4785,2750 4935,2750 5385,2750 5535,2750 7185,2750 7335,2750 7485,2750 7635,2750 360,2900 510,2900 660,2900 810,2900 960,2900 1110,2900 1260,2900 1410,2900 1560,2900 1710,2900 1860,2900 2010,2900 2160,2900 2310,2900 2460,2900 2760,2900 2910,2900 3210,2900 3360,2900 3510,2900 3660,2900 3810,2900 3960,2900 4110,2900 4260,2900 4410,2900 4560,2900 4710,2900 4860,2900 5010,2900 5160,2900 5310,2900 5460,2900 5610,2900 5760,2900 5910,2900 6060,2900 6210,2900 6360,2900 6510,2900 6660,2900 6810,2900 6960,2900 7410,2900 7560,2900 7710,2900 135,3050 285,3050 435,3050 585,3050 1035,3050 1185,3050 1335,3050 1485,3050 1635,3050 1785,3050 1935,3050 2085,3050 2235,3050 2385,3050 2535,3050 2685,3050 2835,3050 2985,3050 3285,3050 3435,3050 3585,3050 3735,3050 3885,3050 4035,3050 4185,3050 4335,3050 4485,3050 4635,3050 4935,3050 5235,3050 5385,3050 5535,3050 5685,3050 5835,3050 5985,3050 6135,3050 6285,3050 6435,3050 6585,3050 6735,3050 6885,3050 7185,3050 7335,3050 7485,3050 7635,3050 360,3200 510,3200 660,3200 960,3200 1110,3200 1260,3200 1410,3200 1560,3200 1710,3200 1860,3200 2010,3200 2160,3200 2310,3200 2460,3200 2610,3200 2760,3200 2910,3200 3060,3200 3210,3200 3660,3200 3810,3200 3960,3200 4110,3200 4260,3200 4410,3200 4560,3200 4710,3200 4860,3200 5010,3200 5160,3200 5610,3200 5760,3200 5910,3200 6060,3200 6210,3200 6360,3200 6510,3200 6660,3200 6810,3200 6960,3200 7410,3200 7560,3200 7710,3200 135,3350 435,3350 585,3350 735,3350 1035,3350 1185,3350 1335,3350 1485,3350 1635,3350 1785,3350 1935,3350 2085,3350 2385,3350 2535,3350 2685,3350 2835,3350 2985,3350 3135,3350 3435,3350 3585,3350 3735,3350 3885,3350 4035,3350 4335,3350 4485,3350 4635,3350 4785,3350 5535,3350 5685,3350 5835,3350 5985,3350 6135,3350 6285,3350 6435,3350 6585,3350 6735,3350 6885,3350 7185,3350 7335,3350 7485,3350 7635,3350 510,3500 660,3500 1110,3500 1260,3500 1410,3500 1560,3500 1710,3500 1860,3500 2010,3500 2160,3500 2310,3500 2460,3500 2610,3500 2760,3500 2910,3500 3060,3500 3210,3500 3360,3500 3660,3500 3810,3500 3960,3500 4110,3500 4260,3500 4410,3500 4560,3500 5010,3500 5310,3500 5460,3500 5610,3500 5760,3500 5910,3500 6060,3500 6210,3500 6360,3500 6510,3500 6660,3500 6810,3500 6960,3500 7410,3500 7560,3500 7710,3500 135,3650 435,3650 585,3650 735,3650 885,3650 1035,3650 1185,3650 1335,3650 1485,3650 1635,3650 1785,3650 1935,3650 2085,3650 2235,3650 2385,3650 2685,3650 3435,3650 3585,3650 3735,3650 3885,3650 4035,3650 4185,3650 4335,3650 4785,3650 5235,3650 5385,3650 5535,3650 5685,3650 5835,3650 5985,3650 6135,3650 6285,3650 6435,3650 6585,3650 6735,3650 6885,3650 7185,3650 7335,3650 7485,3650 7635,3650 3930,3730 3775,3750 360,3800 660,3800 810,3800 1110,3800 1260,3800 1410,3800 1560,3800 1710,3800 1860,3800 2010,3800 2160,3800 2310,3800 2460,3800 3360,3800 3510,3800 3660,3800 3810,3800 3960,3800 4110,3800 5160,3800 5310,3800 5610,3800 5760,3800 5910,3800 6060,3800 6210,3800 6360,3800 6510,3800 6660,3800 6810,3800 6960,3800 7410,3800 7560,3800 7710,3800 4230,3880 4165,3885 135,3950 285,3950 435,3950 585,3950 735,3950 885,3950 1035,3950 1185,3950 1335,3950 1485,3950 1635,3950 1785,3950 1935,3950 2085,3950 2235,3950 2385,3950 2535,3950 2685,3950 2985,3950 3435,3950 3585,3950 3735,3950 3885,3950 4035,3950 4185,3950 4335,3950 4485,3950 5085,3950 5235,3950 5385,3950 5535,3950 5685,3950 5835,3950 5985,3950 6135,3950 6285,3950 6435,3950 6585,3950 6735,3950 6885,3950 7185,3950 7335,3950 7485,3950 7635,3950 210,4100 360,4100 510,4100 660,4100 810,4100 960,4100 1110,4100 1260,4100 1410,4100 1560,4100 1710,4100 1860,4100 2010,4100 2160,4100 2310,4100 2460,4100 2610,4100 2760,4100 3210,4100 3510,4100 3660,4100 3810,4100 3960,4100 4110,4100 4260,4100 4410,4100 4560,4100 5310,4100 5460,4100 5610,4100 5910,4100 6060,4100 6210,4100 6360,4100 6510,4100 6660,4100 6960,4100 7410,4100 7560,4100 7710,4100 3025,4220 3110,4220 4890,4235 4980,4235 135,4250 285,4250 435,4250 585,4250 735,4250 885,4250 1035,4250 1185,4250 1335,4250 1485,4250 1635,4250 1785,4250 1935,4250 2085,4250 2235,4250 2385,4250 2535,4250 2685,4250 2835,4250 3435,4250 3585,4250 4485,4250 4635,4250 4785,4250 5385,4250 5535,4250 5685,4250 5835,4250 5985,4250 6135,4250 6285,4250 6435,4250 6585,4250 6735,4250 6885,4250 7185,4250 7335,4250 7485,4250 7635,4250 3025,4305 3110,4305 4890,4316 4975,4316 210,4400 360,4400 510,4400 660,4400 810,4400 960,4400 1110,4400 1260,4400 1410,4400 1560,4400 1710,4400 1860,4400 2010,4400 2160,4400 2460,4400 3510,4400 3660,4400 3810,4400 3960,4400 4110,4400 4260,4400 4410,4400 4710,4400 5310,4400 5460,4400 5610,4400 5760,4400 5910,4400 6210,4400 6360,4400 6510,4400 6660,4400 7560,4400 135,4550 285,4550 585,4550 735,4550 885,4550 1035,4550 1185,4550 1335,4550 1485,4550 1635,4550 1785,4550 1935,4550 2085,4550 2235,4550 2535,4550 3285,4550 3585,4550 3735,4550 3885,4550 4035,4550 4185,4550 4335,4550 5385,4550 5535,4550 5685,4550 5835,4550 5985,4550 6135,4550 6285,4550 6435,4550 6585,4550 6735,4550 6885,4550 7185,4550 7485,4550 7635,4550 210,4700 360,4700 660,4700 810,4700 960,4700 1110,4700 1260,4700 1410,4700 1560,4700 1710,4700 1860,4700 2010,4700 2160,4700 2310,4700 2460,4700 2610,4700 2760,4700 2910,4700 3210,4700 3360,4700 3510,4700 3660,4700 3810,4700 3960,4700 4110,4700 4260,4700 4410,4700 5010,4700 5160,4700 5310,4700 5460,4700 5610,4700 5760,4700 5910,4700 6060,4700 6210,4700 6360,4700 6510,4700 6660,4700 6810,4700 6960,4700 7410,4700 7560,4700 7710,4700 135,4850 285,4850 435,4850 1035,4850 1185,4850 1335,4850 1485,4850 1635,4850 1785,4850 1935,4850 2085,4850 2235,4850 2535,4850 2685,4850 2835,4850 2985,4850 4185,4850 4335,4850 4785,4850 4935,4850 5085,4850 5235,4850 5385,4850 5685,4850 5985,4850 6135,4850 6285,4850 6435,4850 6585,4850 6735,4850 6885,4850 7185,4850 7335,4850 7485,4850 7635,4850 210,5000 360,5000 510,5000 810,5000 960,5000 1110,5000 1260,5000 1410,5000 1560,5000 1710,5000 1860,5000 2010,5000 2160,5000 2310,5000 2460,5000 2610,5000 2760,5000 2910,5000 3060,5000 3210,5000 3360,5000 3510,5000 3660,5000 3810,5000 4260,5000 4710,5000 4860,5000 5010,5000 5160,5000 5460,5000 5760,5000 6060,5000 6210,5000 6360,5000 7410,5000 7560,5000 735,5150 885,5150 1035,5150 1185,5150 1335,5150 1485,5150 1635,5150 1785,5150 1935,5150 2085,5150 2235,5150 2385,5150 2535,5150 2685,5150 2835,5150 2985,5150 3135,5150 3285,5150 3435,5150 3585,5150 3735,5150 3885,5150 4035,5150 4635,5150 4785,5150 4935,5150 5085,5150 5235,5150 5385,5150 5535,5150 5985,5150 6135,5150 6285,5150 6585,5150 7785,5150 210,5300 360,5300 510,5300 660,5300 810,5300 960,5300 1110,5300 1260,5300 1410,5300 1560,5300 1710,5300 1860,5300 2010,5300 2160,5300 2310,5300 2460,5300 2760,5300 3060,5300 3210,5300 3360,5300 3510,5300 3660,5300 3810,5300 3960,5300 4110,5300 4710,5300 4860,5300 5010,5300 5160,5300 5460,5300 5910,5300 6060,5300 6360,5300 6510,5300 6960,5300 7110,5300 7260,5300 7410,5300 7560,5300 7710,5300 6570,5315 135,5450 285,5450 435,5450 585,5450 1335,5450 1485,5450 1635,5450 1785,5450 1935,5450 2085,5450 2235,5450 2385,5450 2535,5450 2835,5450 2985,5450 3135,5450 3285,5450 3435,5450 3585,5450 3735,5450 3885,5450 4035,5450 4635,5450 4785,5450 4935,5450 5085,5450 5235,5450 5535,5450 5985,5450 6135,5450 6435,5450 6885,5450 210,5600 360,5600 510,5600 660,5600 810,5600 960,5600 1110,5600 1260,5600 1410,5600 1560,5600 1710,5600 1860,5600 2010,5600 2160,5600 2310,5600 2460,5600 2760,5600 2910,5600 3060,5600 3360,5600 5910,5600 6060,5600 6210,5600 6660,5600 6810,5600 135,5750 435,5750 885,5750 1035,5750 1335,5750 1485,5750 1635,5750 1785,5750 1935,5750 2085,5750 2235,5750 2385,5750 2535,5750 2685,5750 2835,5750 2985,5750 3135,5750 3285,5750 3435,5750 4635,5750 4785,5750 4935,5750 5085,5750 5235,5750 5535,5750 5985,5750 6135,5750 6585,5750 6735,5750 6885,5750 210,5900 360,5900 510,5900 660,5900 810,5900 960,5900 1110,5900 1260,5900 1410,5900 1560,5900 1710,5900 1860,5900 2010,5900 2160,5900 2310,5900 2460,5900 2610,5900 2910,5900 3060,5900 3210,5900 3360,5900 3660,5900 5910,5900 6360,5900 6660,5900 135,6050 435,6050 585,6050 885,6050 1035,6050 1185,6050 1335,6050 1485,6050 1635,6050 1785,6050 1935,6050 2085,6050 2235,6050 2385,6050 2535,6050 2685,6050 2835,6050 2985,6050 3135,6050 3285,6050 3435,6050 4185,6050 4635,6050 4785,6050 4935,6050 5085,6050 5235,6050 5385,6050 5535,6050 6285,6050 6435,6050 6585,6050 210,6200 810,6200 960,6200 1110,6200 1260,6200 1410,6200 1560,6200 1710,6200 1860,6200 2010,6200 2160,6200 2310,6200 2460,6200 2760,6200 2910,6200 3060,6200 3210,6200 3360,6200 3660,6200 5760,6200 6210,6200 6360,6200 6510,6200 6660,6200 6810,6200 135,6350 285,6350 435,6350 585,6350 735,6350 885,6350 1035,6350 1185,6350 1335,6350 1485,6350 1635,6350 2235,6350 2385,6350 2535,6350 2685,6350 2835,6350 2985,6350 3135,6350 4635,6350 4785,6350 4935,6350 5385,6350 5835,6350 5985,6350 6135,6350 6285,6350 6435,6350 6585,6350 6735,6350 6885,6350 210,6500 360,6500 510,6500 810,6500 960,6500 1110,6500 1260,6500 1410,6500 1560,6500 2310,6500 2460,6500 2610,6500 2760,6500 2910,6500 3060,6500 3360,6500 4410,6500 5160,6500 5460,6500 5610,6500 5910,6500 6060,6500 6210,6500 6360,6500 6510,6500 6660,6500 6810,6500 135,6650 285,6650 435,6650 585,6650 735,6650 885,6650 1935,6650 2085,6650 2235,6650 2385,6650 2535,6650 2685,6650 2835,6650 3435,6650 4785,6650 4935,6650 5835,6650 5985,6650 6135,6650 6285,6650 6435,6650 6585,6650 6735,6650 6885,6650 7035,6650 7185,6650 7485,6650 7635,6650 7785,6650 1705,6740 1755,6740 210,6800 360,6800 510,6800 660,6800 2010,6800 2160,6800 2610,6800 2760,6800 3060,6800 3360,6800 3510,6800 3660,6800 4110,6800 4260,6800 4410,6800 5160,6800 5610,6800 5760,6800 5910,6800 6060,6800 6210,6800 6660,6800 6810,6800 6960,6800 7410,6800 7710,6800 1705,6810 1755,6810 4768.78,6843.78 135,6950 285,6950 435,6950 585,6950 885,6950 1185,6950 1335,6950 1485,6950 1935,6950 2235,6950 2385,6950 2535,6950 3135,6950 3285,6950 3585,6950 4035,6950 4335,6950 5835,6950 5985,6950 6135,6950 6285,6950 6585,6950 6885,6950 7485,6950 7785,6950 210,7100 360,7100 510,7100 810,7100 960,7100 1260,7100 1410,7100 1560,7100 1710,7100 1860,7100 2010,7100 2160,7100 2310,7100 2460,7100 2760,7100 3210,7100 3660,7100 4110,7100 4260,7100 4410,7100 4710,7100 4860,7100 5160,7100 5310,7100 5460,7100 5610,7100 5760,7100 5910,7100 6060,7100 6210,7100 6360,7100 6510,7100 6660,7100 6810,7100 6960,7100 7110,7100 7260,7100 7410,7100 7560,7100 7710,7100 135,7250 285,7250 435,7250 585,7250 735,7250 885,7250 1185,7250 1335,7250 1485,7250 1635,7250 1935,7250 2085,7250 2235,7250 2535,7250 2835,7250 2985,7250 3135,7250 3285,7250 3435,7250 3585,7250 6285,7250 6435,7250 6585,7250 6735,7250 6885,7250 7035,7250 7185,7250 7335,7250 7485,7250 7635,7250 7785,7250 210,7400 360,7400 510,7400 660,7400 810,7400 960,7400 1110,7400 1260,7400 1410,7400 1560,7400 1710,7400 1860,7400 2010,7400 2160,7400 2460,7400 2760,7400 3060,7400 3210,7400 3360,7400 3510,7400 3660,7400 5760,7400 5910,7400 6060,7400 6360,7400 6510,7400 6660,7400 7110,7400 7260,7400 7410,7400 7560,7400 7710,7400 135,7550 285,7550 435,7550 585,7550 735,7550 885,7550 1185,7550 1335,7550 1485,7550 1635,7550 1785,7550 1935,7550 2085,7550 2535,7550 2835,7550 2985,7550 3135,7550 3285,7550 3435,7550 3585,7550 3735,7550 3885,7550 4485,7550 4935,7550 5085,7550 5235,7550 6135,7550 6285,7550 6585,7550 6735,7550 6885,7550 7035,7550 7185,7550 7335,7550 7485,7550 7635,7550 7785,7550 210,7700 360,7700 510,7700 660,7700 810,7700 1110,7700 1260,7700 1410,7700 1560,7700 1710,7700 1860,7700 2010,7700 2160,7700 2460,7700 2760,7700 3060,7700 3210,7700 3360,7700 3510,7700 3660,7700 3810,7700 3960,7700 5010,7700 5160,7700 5310,7700 5460,7700 5760,7700 5910,7700 6660,7700 6960,7700 135,7850 285,7850 435,7850 585,7850 735,7850 885,7850 1185,7850 1335,7850 1485,7850 1635,7850 1785,7850 1935,7850 2085,7850 2535,7850 2835,7850 2985,7850 3135,7850 3285,7850 3435,7850 3585,7850 3735,7850 3885,7850 4035,7850 4785,7850 4935,7850 5085,7850 5235,7850 5385,7850 5835,7850 5985,7850 6135,7850 6885,7850 7035,7850 6670,7950 6740,7950 6705,7985 210,8000 360,8000 510,8000 660,8000 810,8000 1110,8000 1260,8000 1410,8000 1560,8000 1710,8000 1860,8000 2010,8000 2160,8000 2460,8000 2760,8000 3060,8000 3210,8000 3360,8000 3510,8000 3660,8000 3810,8000 3960,8000 4410,8000 4560,8000 5010,8000 5160,8000 5310,8000 6060,8000 6670,8020 6740,8020 135,8150 285,8150 435,8150 585,8150 735,8150 1035,8150 1185,8150 1335,8150 1485,8150 1635,8150 1785,8150 1935,8150 2085,8150 2535,8150 2835,8150 2985,8150 3135,8150 3285,8150 3435,8150 3585,8150 3735,8150 3885,8150 4035,8150 4185,8150 4335,8150 4485,8150 4635,8150 4785,8150 5385,8150 6135,8150 6285,8150 6735,8150 210,8300 360,8300 510,8300 660,8300 1260,8300 1410,8300 1560,8300 1710,8300 1860,8300 2010,8300 2160,8300 2460,8300 2760,8300 3060,8300 3210,8300 3360,8300 3510,8300 3660,8300 3810,8300 3960,8300 4110,8300 4410,8300 4710,8300 4860,8300 5160,8300 5310,8300 5460,8300 5610,8300 6960,8300 7110,8300 135,8450 285,8450 435,8450 585,8450 735,8450 885,8450 1035,8450 1185,8450 1335,8450 1485,8450 1635,8450 1785,8450 1935,8450 2085,8450 2535,8450 2835,8450 2985,8450 3135,8450 3285,8450 3435,8450 3735,8450 4185,8450 4335,8450 4785,8450 4935,8450 5085,8450 5235,8450 5385,8450 5685,8450 6585,8450 6735,8450 7035,8450 210,8600 360,8600 510,8600 660,8600 1110,8600 1260,8600 1410,8600 1560,8600 1710,8600 1860,8600 2010,8600 2160,8600 2460,8600 2760,8600 3060,8600 3210,8600 3360,8600 3510,8600 3960,8600 4110,8600 4410,8600 4560,8600 4710,8600 4860,8600 5010,8600 5160,8600 5310,8600 5460,8600 5610,8600 5760,8600 5910,8600 6960,8600 7110,8600 7560,8600 135,8750 285,8750 435,8750 585,8750 735,8750 885,8750 1035,8750 1185,8750 1335,8750 1485,8750 1635,8750 1785,8750 1935,8750 2085,8750 2535,8750 2835,8750 2985,8750 3135,8750 3285,8750 3435,8750 3585,8750 3735,8750 3885,8750 4185,8750 4335,8750 4485,8750 4635,8750 4785,8750 4935,8750 5085,8750 5235,8750 5385,8750 5535,8750 5685,8750 5985,8750 6135,8750 6285,8750 6585,8750 7185,8750 7335,8750 7485,8750 7785,8750 4305,8880 360,8900 510,8900 660,8900 960,8900 1110,8900 1260,8900 1410,8900 1560,8900 1710,8900 1860,8900 2010,8900 2160,8900 3060,8900 3210,8900 3360,8900 3510,8900 3660,8900 3810,8900 4110,8900 4260,8900 4560,8900 4860,8900 5160,8900 5310,8900 5610,8900 5760,8900 5910,8900 6060,8900 6210,8900 6360,8900 6510,8900 6960,8900 7260,8900 7410,8900 7560,8900
GPIO0_0/ECAP1: H1.5 R112.1 | length 3222.2
  Top Layer w6: R112.1@4245,7654.92 4788.09,7654.92 5041.58,7908.42 5393.42,7908.42 6090,8605 6745,8605 6935,8795 H1.5@6935,8855
GPIO2_12: R104.2 R299.2 | length 2422.6
  Top Layer w6: R104.2@4180,7655 4180,7685 4210,7715 4760,7715 5005,7960 5300,7960 v1(5510,8170) ; v1(6105,7635) R299.2@6150.08,7635
  Bottom Layer w6: v1(5510,8170) 5570,8170 v1(6105,7635)
GPIO2_14/EPWM1B: H1.4 R110.2 | length 3293.7
  Top Layer w6: R110.2@4115,7654.92 4115,7715 4160,7760 4730,7760 4990,8020 5285,8020 5985,8720 6385,8720 6565,8900 6780,8900 H1.4@6835,8955
GPIO6_14/CLKOUT: H1.6 R83.2 | length 4310.2
  Top Layer w6: R83.2@5129.84,5880 5134.84,5875 v1(5225,5875) ; v1(5430,8020) 6060,8650 6730,8650 6885,8805 6885,8905 H1.6@6935,8955
  Bottom Layer w6: v1(5225,5875) 5280,5875 5430,6025 v1(5430,8020)
GPIO8_1: H1.7 R78.1 | length 6657.3
  Top Layer w6: v1(3620,5475) R78.1@3620,5590 ; v1(5580,7955) 6145,8520 6835,8520 7035,8720 H1.7@7035,8855
  Bottom Layer w6: v1(3620,5475) 5560,5475 5830,5745 5830,5965 5580,6215 v1(5580,7955)
GPIO8_2: H1.8 R75.1 | length 6591.3
  Top Layer w6: v1(3685,5515) R75.1@3685,5590.08 ; v1(5525,7980) 6110,8565 6760,8565 6985,8790 6985,8905 H1.8@7035,8955
  Bottom Layer w6: v1(3685,5515) 5550,5515 5785,5750 5785,5960 5525,6220 v1(5525,7980)
H1-3: H1.3 R298.2 R299.1 | length 1549.2
  Top Layer w6: v1(6209.92,7684.92) R299.1@6209.92,7635 R298.2@6280.16,7635
  Bottom Layer w6: v1(6209.92,7684.92) 6209.92,8229.92 H1.3@6835,8855
H16: CON2.7 R104.1 | length 1323.3
  Top Layer w6: CON2.7@4009.44,6429.16 4009.79,6429.51 4084.65,6429.51 v1(4085,6429.86) ; v1(4180,7520) R104.1@4180,7595.16
  Bottom Layer w6: v1(4085,6429.86) 4129.86,6429.86 4200,6500 4200,7500 v1(4180,7520)
H17: CON2.3 R100.1 | length 1296.2
  Top Layer w6: CON2.3@4009.44,6389.86 4080.14,6389.86 4095,6375 v1(4115,6375) ; v1(4300,6330) 4300,6285 4415,6170 5045,6170 5125,6250 R100.1@5155.08,6250
  Bottom Layer w6: v1(4115,6375) 4160,6330 v1(4300,6330)
IO1+: 18.1 C125.2 J2.1 R136.2 R152.1 U17.3 | length 3289.5
  Top Layer w10: U17.3@790,920 874.92,920 R136.2@875,919.92 975.79,919.92 C125.2@990.08,934.21 ; 18.1@990,1085 990,1010.08 R152.1@990.08,1010 C125.2@990.08,934.21 ; J2.1@3430,170 3480,220 3480,350 3350,480 1495,480 1088.25,886.75 1037.54,886.75 C125.2@990.08,934.21
IO1-: 2.1 C88.1 J2.2 R136.1 U17.2 | length 2935.5
  Top Layer w10: U17.2@790,870 822.87,870 832.79,860.08 R136.1@875,860.08 875.08,860 C88.1@990.08,860 990,859.92 2.1@990,780 1335,435 3265,435 J2.2@3430,270
IO2+: 24.1 C136.2 J2.3 R147.2 R163.1 U23.3 | length 2672.5
  Top Layer w10: U23.3@1690,920 1779.92,920 R147.2@1780,919.92 1826.91,919.92 1841.99,935 C136.2@1900.07,935 ; 24.1@1895,1085 1895,1015.07 R163.1@1900.07,1010 C136.2@1900.07,935 ; J2.3@3530,170 3580.73,220.73 3580.73,440.76 3466.49,555 2150,555 2055,650 2055,835 1995,895 1908.52,895 1900.07,903.45 C136.2@1900.07,935
IO2-: 8.1 C95.1 J2.4 R147.1 U23.2 | length 2300.7
  Top Layer w10: U23.2@1690,870 1722.87,870 1732.79,860.08 R147.1@1780,860.08 1780.08,860 C95.1@1900.08,860 1895,854.92 8.1@1895,780 1895,625 2000,520 3395,520 3530,385 J2.4@3530,270
IO3+: 22.1 C134.2 J2.5 R143.2 R158.1 U22.3 | length 1760.5
  Top Layer w10: U22.3@2590,920 2684.92,920 R143.2@2685,919.92 2795.76,919.92 C134.2@2810.06,934.21 ; 22.1@2810,1085 2810,1010.06 R158.1@2810.06,1010 C134.2@2810.06,935 ; J2.5@3630,170 3680,220 3680,470 3525,625 3200,625 2938.25,886.75 2858.31,886.75 2820.8,924.25 2820.02,924.25 C134.2@2810.06,934.21 ; C134.2@2810.06,934.21 C134.2@2810.06,935 ; C134.2@2810.06,934.21 C134.2@2810.06,935
IO3-: 5.1 C94.1 J2.6 R143.1 U22.2 | length 1451.8
  Top Layer w10: U22.2@2590,870 2675.08,870 R143.1@2685,860.08 2808.55,860.08 C94.1@2808.63,860 2805,856.37 5.1@2805,775 2990,590 3495,590 3630,455 J2.6@3630,270
IO4+: 23.1 C132.2 J2.7 R144.2 R160.1 U21.3 | length 1195.1
  Top Layer w10: U21.3@3490,920 3590.87,920 3605.87,935 C132.2@3720.04,935 R160.1@3720.04,1010 R160.1@3720.04,1010 23.1@3720,1085 ; C132.2@3720.04,934.21 3732.01,922.25 3732.79,922.25 3750,905.04 3750,820 3778.32,791.68 3778.32,228.32 3730,180 J2.7@3730,170
IO4-: 6.1 C91.1 J2.8 R144.1 U21.2 | length 833.6
  Top Layer w10: U21.2@3490,870 3580.08,870 R144.1@3590,860.08 3717.82,860.08 C91.1@3717.9,860 3710,852.1 6.1@3710,785 3710,770.64 3730,750.64 J2.8@3730,270
IO5+: 17.1 C122.2 J2.9 R130.2 R148.1 U16.3 | length 1905.5
  Top Layer w10: J2.9@3830,170 3879.86,219.86 3879.86,374.86 4100,595 4560,595 4755,790 4755,875 4735,895 4670.03,895 4640.78,924.25 4639.99,924.25 4630.03,934.21 C122.2@4630.03,935 ; U16.3@4390,920 4494.92,920 R130.2@4495,919.92 ; R130.2@4495.79,919.92 4510.87,935 C122.2@4630.03,935 ; 17.1@4635,1085 4635,1014.97 R148.1@4630.03,1010 C122.2@4630.03,935
IO5-: 1.1 C87.1 J2.10 R130.1 U16.2 | length 1436.8
  Top Layer w10: J2.10@3830,270 3830,410 4045,625 4515,625 4625,735 1.1@4625,785 4625,857.82 C87.1@4627.18,860 4627.1,860.08 R130.1@4495,860.08 4485.08,870 U16.2@4390,870
IO6+: 19.1 C127.2 J2.11 R137.2 R153.1 U18.3 | length 2690.3
  Top Layer w10: J2.11@3930,170 3973.04,213.04 3973.04,368.02 4140.02,535 5380,535 5660,815 5660,860 5622,898 5590.6,898 5572.91,915.69 5562.77,925.83 5549.19,925.83 C127.2@5540.02,935 ; U18.3@5290,920 5399.92,920 R137.2@5400,919.92 5400.79,919.92 5415.87,935 C127.2@5540.02,935 ; 19.1@5540,1085 R153.1@5540.02,1010 C127.2@5540.02,935
IO6-: 3.1 C89.1 J2.12 R137.1 U18.2 | length 2197.2
  Top Layer w10: J2.12@3930,270 3930,360 4135,565 5315,565 3.1@5530,780 5530,853.55 C89.1@5536.45,860 5536.37,860.08 R137.1@5400,860.08 5390.08,870 U18.2@5290,870
IO7+: 20.1 C128.2 J2.13 R138.2 R155.1 U19.3 | length 3374.8
  Top Layer w10: J2.13@4030,170 4030,180 4077.07,227.07 4077.07,302.07 4255,480 6235,480 6480,725 6480,904.22 6450.01,934.21 C128.2@6450.01,935 ; U19.3@6190,920 6304.92,920 R138.2@6305,919.92 ; R138.2@6305.79,919.92 6320.87,935 C128.2@6450.01,935 ; 20.1@6445,1090 6445,1010.16 R155.1@6450.16,1005 6450.16,935.15 C128.2@6450.01,935
IO7-: 7.1 C90.1 J2.14 R138.1 U19.2 | length 3039.9
  Top Layer w10: J2.14@4030,270 4030,355 4180,505 6200,505 6395,700 6395,779.36 6408.74,793.1 6408.74,793.74 6450.08,835.08 C90.1@6450.08,860 6450,860.08 R138.1@6305,860.08 6295.08,870 U19.2@6190,870
IO8+: 21.1 C130.2 J2.15 R142.2 R157.1 U20.3 | length 4159.2
  Top Layer w10: J2.15@4130,170 4180,220 4180,315 4285,420 7135,420 7390,675 7390,905 7370.75,924.25 7369.96,924.25 7360,934.21 C130.2@7360,935 ; U20.3@7161.91,920 7244.53,920 R142.2@7244.61,919.92 7289.18,919.92 7304.26,935 C130.2@7360,935 ; 21.1@7355,1090 7355,1015 R157.1@7360,1010 C130.2@7360,935
IO8-: 4.1 C93.1 J2.16 R142.1 U20.2 | length 3716.3
  Top Layer w10: J2.16@4130,270 4140.14,280.14 4140.14,312.5 4277.63,450 6985,450 4.1@7315,780 7360.16,825.16 C93.1@7360.16,860 7360.08,860.08 R142.1@7244.61,860.08 7234.68,870 U20.2@7161.91,870
IOVDD: -1.1 C2.1 C4.1 C5.1 C10.1 C11.2 C18.1 C19.1 C24.1 C35.2 C42.1 C43.1 C50.1 C72.1 C73.1 C82.1 C83.1 CON3.42 D2.2 D4.2 H1.1 JTAG1.5 L1.2 OSC1.4 R1.2 R3.1 R9.2 R10.1 R11.2 R14.2 R16.2 R17.2 R18.2 R19.1 R20.1 R21.1 R22.1 R30.2 R33.2 R38.1 R40.1 R41.2 R47.2 R58.1 R59.1 R61.1 R62.1 R72.2 R76.2 R81.2 R82.2 R92.2 R108.1 R116.2 R118.2 R121.2 R129.1 U1.4 U1.16 U3.12 U4.8 U5.8 U6.5 U9.18 U10.12 U12.14 U13.1 U15.2 U15.4 | length 5620.8
  Top Layer w10: v1@3125,4480 3154.92,4480 C19.1@3160,4485.08 3160,4437.56 3140,4417.56 U3.12@3140,4380 ; v1(3775,5870) 3776.3,5868.7 3858.94,5868.7 CON3.42@3859.84,5867.8 ; v1(4960,4500) 4995,4500 C50.1@5000,4505 5000,4445.02 5005.85,4439.17 U10.12@5005.85,4388.2 ; C73.1@6495,8020.08 6500.55,8014.53 U12.14@6629.53,8014.53
  Top Layer w15: JTAG1.5@2495,8790 JTAG1.5@2495,8790 2495.04,8615.04 C5.1@2495.08,8615 ; v1(2635,4635) R19.1@2635,4575 R19.1@2635,4575 2699.96,4574.96 R20.1@2700,4574.92 R21.1@2765,4574.92 ; R22.1@2830,4575 v1(2830,4635) ; U5.8@3356.5,7150 3410,7150 3441.75,7118.25 3441.75,7117.46 3449.21,7110 C18.1@3450,7110 3450.08,7109.92 3529.92,7109.92 R38.1@3530,7109.84 3530.16,7110 v1(3580,7110) ; v1(3390,6940) R40.1@3450,6940 ; v1(3605,8355) 3607.47,8357.47 R9.2@3607.47,8420 ; v1(3705,8355) 3705,8356.35 3708.03,8359.38 R11.2@3708.03,8420 ; C10.1@3790,4240 3924.13,4240 3934.21,4250.08 C11.2@3935,4250.08 ; v1(3812,8352) R14.2@3812,8420 ; R16.2@3907.9,8420 3907.9,8348.46 3910,8346.35 v1(3910,8345) ; R17.2@4009.08,8420 4009.54,8419.54 4009.54,8350.46 v1(4010,8350) ; OSC1.4@4108.3,4245.6 4112.78,4250.08 R18.2@4210.79,4250.08 ; R18.2@4210,4250.08 4255.08,4250.08 4355,4350 v1(4355,4450) ; v1(4315,4980) R108.1@4315,5039.92 ; v1(4480,8415) R1.2@4480,8485.08 ; v1(5320,6545) R121.2@5320,6600.08 ; R10.1@5370,8544.92 5449.92,8544.92 v1(5450,8545) ; v1(5385,6555) R118.2@5385,6600.16 ; v1(5450,6560) R116.2@5450,6600.08 ; v1@5570,5140 v1(5571.61,5138.39) D2.2@5625,5138.39 5626.73,5136.66 5703.27,5136.66 R30.2@5705,5134.92 ; v1(5610,5205) R41.2@5665.08,5205 ; R33.2@5720,5504.92 5720.79,5504.92 5754.91,5539.04 5759.04,5539.04 v1(5760,5540) ; C42.1@5816.26,4885 5818.21,4886.95 5818.21,5023.05 C43.1@5820.16,5025 5820.16,5101.88 U9.18@5817.04,5105 ; R92.2@6425,8289.84 v1(6425,8360) ; v1(6550,6655) R129.1@6550,6725 ; 6670,6055 6670.16,6054.84 R3.1@6730,6054.84 ; v1(6990,7015) 6990.08,7015.08 C35.2@7060,7015.08 7060,6934.16 7055.84,6930 U4.8@7055,6930 ; v1(7155,7380) L1.2@7155,7445 ; v1(7190,4490) C4.1@7240.08,4490 7237.54,4487.46 7237.54,4387.26 U1.4@7235,4384.72 ; C24.1@7200,4984.92 v1(7269.92,4984.92) v1@7270,4985 ; U1.16@7385,4180 C2.1@7460,4180 v1(7460,4105) ; R76.2@7715,8505 v1(7715,8575)
  Top Layer w20: R47.2@3374.92,4420 v1(3435,4420) ; v1(3615,4460) 3615,4365 3740,4240 C10.1@3790,4240 ; R58.1@4480,4589.92 v1@4480,4640 ; R59.1@4545,4594.92 v1(4545,4645) ; R61.1@4610,4594.92 v1(4610,4645) ; R62.1@4675,4595 v1@4675,4645 ; R82.2@5239.92,4435 5240,4435.08 v1(5240,4480) ; C72.1@6305,8025 6307.46,8022.54 6492.46,8022.54 C73.1@6495,8020 ; v1(6320,7725) R81.2@6385,7725 ; v1(6695,7625) R72.2@6695,7695.08 ; v1(6770,7580) D4.2@6770,7641.61
  Top Layer w30: U15.2@2650,5865 U15.4@2650,5631.15 2646.06,5631.15 2615,5600.08 C82.1@2615,5470 2615,5464.27 2625,5454.27 C83.1@2625,5330 2625,5329.29 2620,5324.29 -1.1@2620,5255 v1(2685,5255) ; C24.1@7200,4984.92 U6.5@7200,5055
  other v1: 3120,4480 4475,4640 4675,4650 6660,6055